# Altium PCB geared_motors.PcbDoc
Units mil, origin at the board's own origin, x right, y up, seen from the top; angles counter-clockwise.
Board outline 6000 x 4000 mil, 2 copper layers (Top Layer, Bottom Layer); 59 components, 40 nets, 210 pads, 0 vias.
Unrouted connection lines stored in the file: 130.
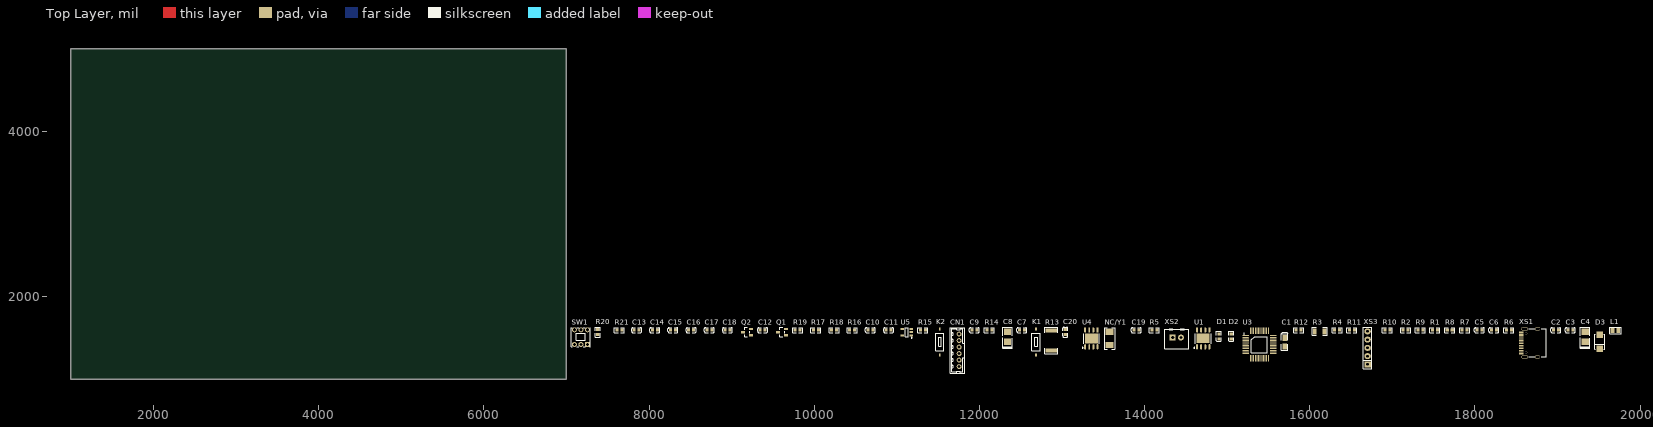
[diagram p0: Top Layer view]
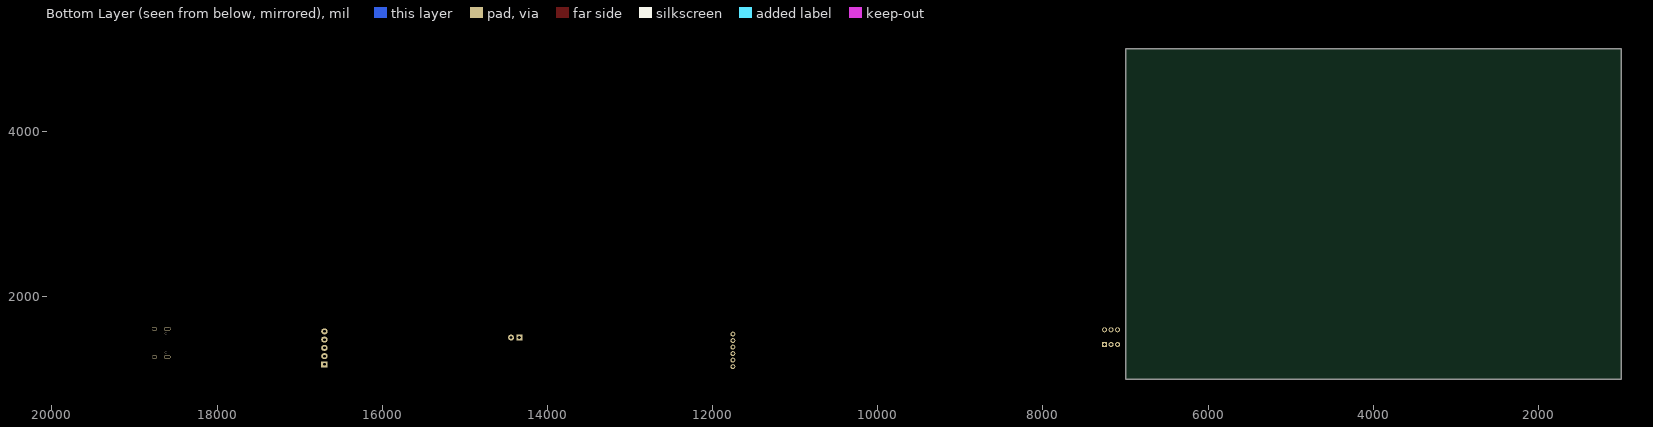
[diagram p1: Bottom Layer view, seen from below]

## Layer stack, top to bottom
Top Solder: solder mask 0.4, Solder Resist, Dk 3.5
Top Layer: signal copper 1.4
Dielectric 1: dielectric 12.6, FR-4, Dk 4.8
Bottom Layer: signal copper 1.4
Bottom Solder: solder mask 0.4, Solder Resist, Dk 3.5

## Board outline
1000,1000 7000,1000 7000,5000 1000,5000

## Design rules (kind name [scope] priority, off if disabled: settings)
AssemblyTestPointUsage [All] p0: scope1count=1 scope1_0_kind=Board scope1_0_value=Board scope2count=1 scope2_0_kind=Board scope2_0_value=Board commentlength=0
AssemblyTestpoint [All] p0: scope1count=1 scope1_0_kind=Board scope1_0_value=Board scope2count=1 scope2_0_kind=Board scope2_0_value=Board commentlength=0
Clearance [All] p0: scope1count=1 scope1_0_kind=Board scope1_0_value=Board scope2count=1 scope2_0_kind=Board scope2_0_value=Board commentlength=0 gap=10
Clearance [All] p1: gap=10 ignorepadtopadclearanceinfootprint=FALSE except(0: Arc-Hole Track-Hole SMDPad-Hole THPad-Hole Via-Hole Fill-Hole Poly-Hole Region-Hole Text-Hole)
ComponentClearance [All] p0: scope1count=1 scope1_0_kind=Board scope1_0_value=Board scope2count=1 scope2_0_kind=Board scope2_0_value=Board commentlength=0 gap=10 collisioncheckmode=3
DiffPairsRouting [All] p0: scope1count=1 scope1_0_kind=Board scope1_0_value=Board scope2count=1 scope2_0_kind=Board scope2_0_value=Board commentlength=0
FabricationTestPointUsage [All] p0: scope1count=1 scope1_0_kind=Board scope1_0_value=Board scope2count=1 scope2_0_kind=Board scope2_0_value=Board commentlength=0 valid=0 allowmultiple=FALSE
FabricationTestpoint [All] p0: scope1count=1 scope1_0_kind=Board scope1_0_value=Board scope2count=1 scope2_0_kind=Board scope2_0_value=Board commentlength=0 side=3 testpointundercomponent=TRUE minsize=40 maxsize=100 preferedsize=60 minholesize=0 maxholesize=40 preferedholesize=32 testpointgrid=1
FanoutControl Fanout_BGA [All] p0 off: scope1count=1 scope1_0_kind=Board scope1_0_value=Board scope2count=1 scope2_0_kind=Board scope2_0_value=Board commentlength=69 // Protel DXP Scope 1 Expression Was: IsBGA   Fanout_BGA (Default Rule)
FanoutControl Fanout_LCC [All] p0 off: scope1count=1 scope1_0_kind=Board scope1_0_value=Board scope2count=1 scope2_0_kind=Board scope2_0_value=Board commentlength=69 // Protel DXP Scope 1 Expression Was: IsLCC   Fanout_LCC (Default Rule)
FanoutControl Fanout_SOIC [All] p0 off: scope1count=1 scope1_0_kind=Board scope1_0_value=Board scope2count=1 scope2_0_kind=Board scope2_0_value=Board commentlength=71 // Protel DXP Scope 1 Expression Was: IsSOIC   Fanout_SOIC (Default Rule)
FanoutControl Fanout_Small [All] p0 off: scope1count=1 scope1_0_kind=Board scope1_0_value=Board scope2count=1 scope2_0_kind=Board scope2_0_value=Board commentlength=84 // Protel DXP Scope 1 Expression Was: (CompPinCount < 5)   Fanout_Small (Default Rule)
FanoutControl Fanout_Default [All] p0: scope1count=1 scope1_0_kind=Board scope1_0_value=Board scope2count=1 scope2_0_kind=Board scope2_0_value=Board commentlength=30 // Fanout_Default (Default Rule)
Height [All] p0: scope1count=1 scope1_0_kind=Board scope1_0_value=Board scope2count=1 scope2_0_kind=Board scope2_0_value=Board commentlength=0
HoleSize [All] p0: scope1count=1 scope1_0_kind=Board scope1_0_value=Board scope2count=1 scope2_0_kind=Board scope2_0_value=Board commentlength=0 absolutevalues=TRUE maxlimit=100 minlimit=1 maxpercent=80.000 minpercent=20.000
HoleToHoleClearance [All] p0: scope1count=1 scope1_0_kind=Board scope1_0_value=Board scope2count=1 scope2_0_kind=Board scope2_0_value=Board commentlength=0
LayerPairs [All] p0: scope1count=1 scope1_0_kind=Board scope1_0_value=Board scope2count=1 scope2_0_kind=Board scope2_0_value=Board commentlength=0 enforce=TRUE
MinimumSolderMaskSliver [All] p0: scope1count=1 scope1_0_kind=Board scope1_0_value=Board scope2count=1 scope2_0_kind=Board scope2_0_value=Board commentlength=0
NetAntennae [All] p0: scope1count=1 scope1_0_kind=Board scope1_0_value=Board scope2count=1 scope2_0_kind=Board scope2_0_value=Board commentlength=0
PasteMaskExpansion [All] p0: scope1count=1 scope1_0_kind=Board scope1_0_value=Board scope2count=1 scope2_0_kind=Board scope2_0_value=Board commentlength=0 expansion=0
PlaneClearance [All] p0: scope1count=1 scope1_0_kind=Board scope1_0_value=Board scope2count=1 scope2_0_kind=Board scope2_0_value=Board commentlength=0 clearance=20
PlaneConnect [All] p0: scope1count=1 scope1_0_kind=Board scope1_0_value=Board scope2count=1 scope2_0_kind=Board scope2_0_value=Board commentlength=0 planeconnectstyle=Relief reliefexpansion=20 reliefentries=4 reliefconductorwidth=10 reliefairgap=10
PolygonConnect [All] p0: scope1count=1 scope1_0_kind=Board scope1_0_value=Board scope2count=1 scope2_0_kind=Board scope2_0_value=Board commentlength=0 connectstyle=Relief reliefconductorwidth=10 reliefentries=4 polygonreliefangle="90 Angle"
PolygonConnect [All] p1: connectstyle=Relief reliefconductorwidth=10 reliefentries=4 polygonreliefangle="90 Angle" airgapwidth=10
RoutingCorners [All] p0: scope1count=1 scope1_0_kind=Board scope1_0_value=Board scope2count=1 scope2_0_kind=Board scope2_0_value=Board commentlength=0 cornerstyle=45-Degree minsetback=100 maxsetback=100
RoutingLayers [All] p0: scope1count=1 scope1_0_kind=Board scope1_0_value=Board scope2count=1 scope2_0_kind=Board scope2_0_value=Board commentlength=0 top layer=Automatic bottom layer=Automatic
RoutingPriority [All] p0: scope1count=1 scope1_0_kind=Board scope1_0_value=Board scope2count=1 scope2_0_kind=Board scope2_0_value=Board commentlength=0
RoutingTopology [All] p0: scope1count=1 scope1_0_kind=Board scope1_0_value=Board scope2count=1 scope2_0_kind=Board scope2_0_value=Board commentlength=0 topology=Shortest
RoutingVias [All] p0: scope1count=1 scope1_0_kind=Board scope1_0_value=Board scope2count=1 scope2_0_kind=Board scope2_0_value=Board commentlength=0 holewidth=28 width=50 viastyle="Through Hole" minholewidth=28 minwidth=50 maxholewidth=28 maxwidth=50
RoutingVias [All] p1: holewidth=28 width=50 viastyle="Through Hole" minholewidth=28 minwidth=50 maxholewidth=28 maxwidth=50
ShortCircuit [All] p0: scope1count=1 scope1_0_kind=Board scope1_0_value=Board scope2count=1 scope2_0_kind=Board scope2_0_value=Board commentlength=0 allowed=FALSE
SilkToBoardRegionClearance [All] p0: scope1count=1 scope1_0_kind=Board scope1_0_value=Board scope2count=1 scope2_0_kind=Board scope2_0_value=Board commentlength=0
SilkToSilkClearance [All] p0: scope1count=1 scope1_0_kind=Board scope1_0_value=Board scope2count=1 scope2_0_kind=Board scope2_0_value=Board commentlength=0
SilkToSolderMaskClearance [All] p0 off: scope1count=1 scope1_0_kind=Board scope1_0_value=Board scope2count=1 scope2_0_kind=Board scope2_0_value=Board commentlength=44 // Protel DXP Scope 1 Expression Was: IsPad
SolderMaskExpansion [All] p0: scope1count=1 scope1_0_kind=Board scope1_0_value=Board scope2count=1 scope2_0_kind=Board scope2_0_value=Board commentlength=0 expansion=4
SolderMaskExpansion [All] p1: expansion=4 istentingtop=FALSE
UnRoutedNet [All] p0: scope1count=1 scope1_0_kind=Board scope1_0_value=Board scope2count=1 scope2_0_kind=Board scope2_0_value=Board commentlength=0
UnpouredPolygon [All] p0: scope1count=1 scope1_0_kind=Board scope1_0_value=Board scope2count=1 scope2_0_kind=Board scope2_0_value=Board commentlength=0
Width [All] p0: scope1count=1 scope1_0_kind=Board scope1_0_value=Board scope2count=1 scope2_0_kind=Board scope2_0_value=Board commentlength=0 maxlimit=10 minlimit=10 preferedwidth=10
Width [All] p1: maxlimit=10 minlimit=10 preferedwidth=10
30 further rules are at their usual default settings.

## Components (designator, comment, footprint, x,y, rotation, side; value= is the part's Value field where it differs from the comment)
C1 "10uF (106) ±10% 16V" CASE-A_3216 15695,1450 r90 top
C2 "22uF (226) 20% 6.3V" 0603_C 18980,1595 r0 top
C3 "22uF (226) 20% 6.3V" 0603_C 19155,1595 r0 top
C4 "10uF-16V" CAP-B(3528) 19335,1515 r90 top
C5 "22uF (226) 20% 6.3V" 0603_C 18055,1595 r0 top
C6 "22uF (226) 20% 6.3V" 0603_C 18230,1595 r0 top
C7 "100nF (104) 10% 50V" 0603_C 12515,1595 r0 top
C8 "10uF-16V" CAP-B(3528) 12340,1515 r90 top
C9 "100nF (104) 10% 50V" 0603_C 11940,1595 r0 top
C10 "100nF (104) 10% 50V" 0603_C 10680,1595 r0 top
C11 "10uF (106) 10% 10V" 0603_C 10900,1595 r0 top
C12 "22nF (223) 10% 50V" 0603_C 9375,1595 r0 top
C13 "100nF (104) 10% 50V" 0603_C 7850,1595 r0 top
C14 "100nF (104) 10% 50V" 0603_C 8070,1595 r0 top
C15 "100nF (104) 10% 50V" 0603_C 8290,1595 r0 top
C16 "100nF (104) 10% 50V" 0603_C 8510,1595 r0 top
C17 "100nF (104) 10% 50V" 0603_C 8730,1595 r0 top
C18 "100nF (104) 10% 50V" 0603_C 8950,1595 r0 top
C19 "30pF (300) 5% 50V" 0603_C 13900,1595 r0 top
C20 "30pF (300) 5% 50V" 0603_C 13040,1570 r90 top
CN1 "b6b-ph-k-s(lf)(sn)" CONN-TH_B6B-PH-K-S 11755,1350 r90 top
D1 "绿灯 0603" 0603_LED_S1 14900,1520 r90 top
D2 "红灯 0603" 0603_LED_S1 15050,1520 r90 top
D3 "SS54" SMA(DO-214AC)_S1 19510,1455 r90 top
K1 "KEY" KEY2 12685,1295 r90 top
K2 "KEY" KEY2 11520,1295 r90 top
L1 "3.3uH±10%" 0805_L 19700,1590 r0 top
NC/Y1 "8MHz ±20ppm 20pF" SMD-5032_2P 13575,1495 r90 top
Q1 "SS8550 Y2" SOT-23(SOT-23-3) 9610,1570 r0 top
Q2 "SS8050 Y1" SOT-23(SOT-23-3) 9185,1570 r0 top
R1 "10KΩ (1002) ±1%" 0603_R 17515,1595 r0 top
R2 "10KΩ (1002) ±1%" 0603_R 17160,1595 r0 top
R3 "0.1Ω (R100) ±1%" 1206_R 16120,1580 r0 top
R4 "1KΩ (1001) ±1%" 0603_R 16330,1595 r0 top
R5 "1.2KΩ (1201) ±1%" 0603_R 14120,1595 r0 top
R6 "100KΩ (1003) ±1%" 0603_R 18410,1595 r0 top
R7 "22Ω (22R0) ±1%" 0603_R 17875,1595 r0 top
R8 "22Ω (22R0) ±1%" 0603_R 17695,1595 r0 top
R9 "47KΩ (4702) ±1%" 0603_R 17340,1595 r0 top
R10 "5.1KΩ (5101) ±1%" 0603_R 16940,1595 r0 top
R11 "10KΩ (1002) ±1%" 0603_R 16510,1595 r0 top
R12 "10KΩ (1002) ±1%" 0603_R 15865,1595 r0 top
R13 "R 0.25" 2512_R 12870,1470 r90 top
R14 "10KΩ (1002) ±1%" 0603_R 12120,1595 r0 top
R15 "10KΩ (1002) ±1%" 0603_R 11315,1595 r0 top
R16 "10KΩ (1002) ±1%" 0603_R 10460,1595 r0 top
R17 "510Ω (5100) ±1%" 0603_R 10020,1595 r0 top
R18 "10KΩ (1002) ±1%" 0603_R 10240,1595 r0 top
R19 "1KΩ (1001) ±1%" 0603_R 9800,1595 r0 top
R20 "10KΩ (1002) ±1%" 0603_R 7380,1570 r90 top
R21 "10KΩ (1002) ±1%" 0603_R 7640,1595 r0 top
SW1 "5.8 ZSGT" SW-TH_5.8ZSGT 7175,1510 r0 top
U1 "TP4056" SOP-8_EP_150mil 14710,1495 r0 top
U3 "STM32F103C8T6" LQFP-48 15390,1420 r0 top
U4 "A4950" SOIC-8_EP_150mil 13355,1495 r0 top
U5 "RT9193-33" SOT-23-5 11120,1570 r0 top
XS1 "TYPE-C" Type-C-TOP 18660,1440 r0 top
XS2 "HA-2A" HA-2A 14390,1505 r0 top
XS3 "SIP-5" SIP-5 16700,1380 r90 top

## Footprints (in the part's own frame and the unit in brackets; to place one, negate y for a bottom-side part, rotate by r counter-clockwise, add the part's x,y. Pads: shape width x height; smd on the part's side, far side on the other; paste and mask are expansions set on the pad)
0603_C [mm]
  rect 0.93x0.98 smd: 1(-0.77,0) 2(0.77,0)
  silkscreen extent -1.53,-0.79 1.54,0.79
0603_LED_S1 [mm]
  rect 0.93x0.98 smd: A(0.77,0) K(-0.77,0)
  silkscreen extent -1.5,-0.79 1.54,0.79
0603_R [mm]
  rect 0.93x0.98 smd: 1(-0.77,0) 2(0.77,0)
  silkscreen extent -1.53,-0.79 1.54,0.79
0805_L [mm]
  rect 1.16x1.47 smd: 1(-0.89,0) 2(0.89,0)
  silkscreen extent -1.77,-1.04 1.77,1.03
1206_R [mm]
  rect 1.13x1.8 smd: 1(-1.49,0) 2(1.49,0)
  silkscreen extent -2.36,-1.2 2.35,1.2
2512_R [mm]
  rect 1.25x3.42 smd: 1(-3.1,0) 2(3.1,0)
  silkscreen extent -4.03,-2.01 4.02,2.01
CAP-B(3528) [mm] "B型钽电容"
  rect 2x2.2 smd: 1(-1.5,0) 2(1.5,0)
  silkscreen extent -3.58,-1.47 2.9,1.47
CASE-A_3216 [mm]
  rect 1.8x1.35 smd: 1(1.31,0) 2(-1.31,0)
  silkscreen extent -2.54,-1 2.97,1
CONN-TH_B6B-PH-K-S [mm]
  round 1.5 hole 0.9 paste+0 mask+0: 1(5,0) 2(3,0) 3(1,0) 4(-1,0) 5(-3,0) 6(-5,0)
  silkscreen extent -7,-1.7 7,2.8
HA-2A [mm]
  rect 1.8x1.8 hole 1: 1(-1.27,0)
  round 1.8 hole 1: 2(1.27,0)
  silkscreen extent -3.77,-3.5 3.73,2.5
KEY2 [mm]
  rect 1x0.6 smd: 1(0,0) 2(8,0)
  silkscreen extent 1.33,-1.25 6.67,1.25
LQFP-48 [mm]
  rect 2x0.305 smd: 1(-4.25,2.75)
  oval 2x0.305 smd: 2(-4.25,2.25) 3(-4.25,1.75) 4(-4.25,1.25) 5(-4.25,0.75) 6(-4.25,0.25) 7(-4.25,-0.25) 8(-4.25,-0.75) 9(-4.25,-1.25) 10(-4.25,-1.75) 11(-4.25,-2.25) 12(-4.25,-2.75) 25(4.25,-2.75) 26(4.25,-2.25) 27(4.25,-1.75) 28(4.25,-1.25) 29(4.25,-0.75) 30(4.25,-0.25) 31(4.25,0.25) 32(4.25,0.75) 33(4.25,1.25) 34(4.25,1.75) 35(4.25,2.25) 36(4.25,2.75)
  oval 0.305x2 smd: 13(-2.75,-4.25) 14(-2.25,-4.25) 15(-1.75,-4.25) 16(-1.25,-4.25) 17(-0.75,-4.25) 18(-0.25,-4.25) 19(0.25,-4.25) 20(0.75,-4.25) 21(1.25,-4.25) 22(1.75,-4.25) 23(2.25,-4.25) 24(2.75,-4.25) 37(2.75,4.25) 38(2.25,4.25) 39(1.75,4.25) 40(1.25,4.25) 41(0.75,4.25) 42(0.25,4.25) 43(-0.25,4.25) 44(-0.75,4.25) 45(-1.25,4.25) 46(-1.75,4.25) 47(-2.25,4.25) 48(-2.75,4.25)
  silkscreen extent -4.85,-2.45 2.45,3.51
SIP-5 [mm]
  rect 1.8x2 hole 0.813: 1(-5.08,0)
  oval 1.8x2 hole 0.813: 2(-2.54,0) 3(0,0) 4(2.54,0) 5(5.08,0)
  silkscreen extent -6.35,-1.27 6.35,1.27
SMA(DO-214AC)_S1 [mm]
  rect 2x2 smd: 1(2.1,0) 2(-2.1,0)
  silkscreen extent -2.35,-1.5 2.35,1.5
SMD-5032_2P [mm]
  rect 1.9x2.4 smd: 1(-2.05,0) 2(2.05,0)
  silkscreen extent -3.32,-1.6 3.32,1.6
SOIC-8_EP_150mil [mm]
  rect 4x3 smd: 0(0,0)
  oval 0.6x1.6 smd: 1(-1.905,-2.6) 2(-0.635,-2.6) 3(0.635,-2.6) 4(1.905,-2.6) 5(1.905,2.6) 6(0.635,2.6) 7(-0.635,2.6) 8(-1.905,2.6)
  silkscreen extent -2.85,-3.05 2.4,1.5
SOP-8_EP_150mil [mm]
  rect 4x2.9 smd: 0(0,0)
  oval 0.6x1.6 smd: 1(-1.905,-2.6) 2(-0.635,-2.6) 3(0.635,-2.6) 4(1.905,-2.6) 5(1.905,2.6) 6(0.635,2.6) 7(-0.635,2.6) 8(-1.905,2.6)
  silkscreen extent -2.85,-3.05 2.4,1.5
SOT-23(SOT-23-3) [mm]
  rect 1.25x0.7 smd: 1(1.25,-0.95) 2(1.25,0.95) 3(-1.25,0)
  silkscreen extent -0.65,-1.46 0.9,1.46
SOT-23-5 [mm]
  rect 1.1x0.6 smd: 1(1.4,-0.95) 2(1.4,0) 3(1.4,0.95) 4(-1.4,0.95) 5(-1.4,-0.95)
  silkscreen extent -0.5,-1.87 1.63,1.4
SW-TH_5.8ZSGT [mil]
  rect 60x60 hole 39.37: 1(78.74,-88.59)
  round 60 hole 39.37: 2(0,-88.59) 3(-78.74,-88.59) 4(78.74,88.59) 5(0,88.59) 6(-78.74,88.59)
  Mechanical 1 keep-out region: 7719.09,-85.47 7730.91,-85.47 7730.91,-38.23 7719.09,-38.23
  silkscreen extent -115,-115 115,115
Type-C-TOP [mm]
  round 0.65 hole 0.65: 0(-0.98,-2.89) 0(-0.98,2.89)
  oval 1.6x1 hole 0.6 slot 1.2 at 0 deg: 1(2.52,4.325) 2(2.52,-4.325)
  oval 2.1x1 hole 0.6 slot 1.7 at 0 deg: 3(-1.48,-4.325) 4(-1.48,4.325)
  rrect50% 1.5x0.6 smd: A1B12(-2.52,-3.2) A4B9(-2.52,-2.4) A9B4(-2.52,2.4) A12B1(-2.52,3.2)
  rrect50% 1.5x0.3 smd: A5(-2.52,-1.25) A6(-2.52,-0.25) A7(-2.52,0.25) A8(-2.52,1.25) B5(-2.52,1.75) B6(-2.52,0.75) B7(-2.52,-0.75) B8(-2.52,-1.75)
  silkscreen extent -0.22,-4.33 5.12,4.33

## Part data
C1: library part "3216 10uF (106) 10% 16V", "钽电容"
C2 C3 C5 C6: library part "0603 22uF (226) 20% 6.3V", "贴片电容"
C4 C8: library part C-10uF-16V-B型钽电解电容, "10uF-16V-K-B型"
C7 C9 C10 C13 C14 C15 C16 C17 C18: library part "0603 100nF (104) 10% 50V", "贴片电容"
C11: library part "0603 10uF (106) 10% 10V", "贴片电容"
C12: library part "0603 22nF (223) 10% 50V", "贴片电容"
C19 C20: library part "0603 30pF (300) 5% 50V", "贴片电容"
CN1: library part "PH2.0 1*6p", "插针结构:1x6P;间距:2mm;安装方式:直插;参考系列:PH;总PIN数:6P;排数:1;每排PIN数:6;行距:-;额定电流:2A;触头材质:黄铜;触头镀层:锡;工作温度:-25℃~+85℃;"
D1: library part "0603 绿灯", "发光二极管"
D2: library part "0603 红灯", "发光二极管"
D3: library part "SMA(DO-214AC) SS54", "二极管"
K1 K2: library part KEY_PIN2, "微动 贴片2脚"
L1: library part "0805 3.3uH10%", "贴片电感"
NC/Y1: library part "SMD-5032_2P 8MHz 20ppm 20pF", "贴片晶振"
Q1: library part "SOT-23 SS8550 Y2", "三极管"
Q2: library part "SOT-23 SS8050 Y1", "三极管"
R1 R2 R11 R12 R14 R15 R16 R18 R20 R21: library part "0603 10KΩ (1002) 1%", "贴片电阻"
R3: library part "1206 0.1Ω (R100) 1%", "贴片电阻"
R4 R19: library part "0603 1KΩ (1001) 1%", "贴片电阻"
R5: library part "0603 1.2KΩ (1201) 1%", "贴片电阻"
R6: library part "0603 100KΩ (1003) 1%", "贴片电阻"
R7 R8: library part "0603 22Ω (22R0) 1%", "贴片电阻"
R9: library part "0603 47KΩ (4702) 1%", "贴片电阻"
R10: library part "0603 5.1KΩ (5101) 1%", "贴片电阻"
R13: library part R_2512
R17: library part "0603 510Ω (5100) 1%", "贴片电阻"
SW1: library part 自锁按键开关, "30V 双刀双掷 直插 自锁 泡泡机开关"
U1: library part TP4056_[C16581], "电池电源管理"
U3: "STM32F103C8T6-LQFP-48"
U5: "3.3V超低压差LDO"
XS1: "PIN16"
XS2: "HA-2A 白色"
XS3: "单列直插插座-5"

## Nets (pads, with @x,y where several pads share a name; then routed paths per layer and width w, separated by ;. In a path a pad name is that pad's centre, name@x,y a point inside that pad or via, vN(x,y) a via of type N, cw(c..) or ccw(c..) an arc to the next point about the centre after c; other vN are vias at no path point)
3.3V: C11.2 C13.2 C14.2 C15.2 C16.2 C17.2 C18.2 CN1.5 K2.2 R11.2 R12.2 R14.1 U3.1 U3.9 U3.24 U3.36 U3.48 U4.4 U5.5 XS3.1
12V: C2.2 C3.2 C4.1 C7.2 C8.1 D3.2 R6.2 U4.5
12V_EN: Q1.3 R21.2
AO: U3.27 U4.2
Battey: C5.2 C6.2 L1.1 Q1.2 R18.2 U1.5 XS2.1
BO: U3.26 U4.3
BOOT0: K2.1 R15.2 U3.44
BOOT1: R16.2 U3.20
DM: R7.2 U3.32
DP: R8.2 U3.33
EN12V: R17.2 U3.28
GND: C1.2 C2.1 C3.1 C4.2 C5.1 C6.1 C7.1 C8.2 C9.2 C10.1 C11.1 C12.2 C13.1 C14.1 C15.1 C16.1 C17.1 C18.1 C19.1 C20.1 CN1.2 K1.2 Q2.2 R1.2 R2.1 R5.1 R9.1 R10.1 R13.2 R15.1 R16.1 R20.2 R21.1 U1.1 U1.3 U3.8 U3.23 U3.35 U3.47 U4.0 U4.1 U5.2 XS1.A1B12 XS1.A12B1 XS2.2 XS3.5
M1O1: CN1.1 U4.8
M1O2: CN1.6 U4.6
NetC1_1: C1.1 R3.2 R4.1 U1.4 U1.8
NetC12_1: C12.1 U5.4
NetD1_A: D1.A D2.A R4.2
NetD1_K: D1.K U1.6
NetD2_K: D2.K U1.7
NetD3_1: D3.1 L1.2
NetQ1_1: Q1.1 R19.2
NetQ2_1: Q2.1 R17.1 R20.1
NetQ2_3: Q2.3 R18.1 R19.1
NetR1_1: R1.1 XS1.A5
NetR2_2: R2.2 XS1.B5
NetR5_2: R5.2 U1.2
NetR6_1: R6.1 R10.2
NetR9_2: R9.2
NetR13_1: R13.1 U4.7
OSC_1: C19.2 NC/Y1.2 U3.5
OSC_2: C20.2 NC/Y1.1 U3.6
RES: C9.1 K1.1 R14.2 U3.7 XS3.4
SW: C10.2 U5.1 U5.3
TCK: R12.1 U3.37 XS3.3
TIM2_CH1: CN1.3 U3.10
TIM2_CH2: CN1.4 U3.11
TMS: R11.1 U3.34 XS3.2
USB-PWR-DM: R7.1 XS1.A7 XS1.B7
USB-PWR-DP: R8.1 XS1.A6 XS1.B6
VBUS: R3.1 XS1.A4B9 XS1.A9B4
pads on no net: SW1.1 SW1.2 SW1.3 SW1.4 SW1.5 SW1.6 U1.0 U3.2 U3.3 U3.4 U3.12 U3.13 U3.14 U3.15 U3.16 U3.17 U3.18 U3.19 U3.21 U3.22 U3.25 U3.29 U3.30 U3.31 U3.38 U3.39 U3.40 U3.41 U3.42 U3.43 U3.45 U3.46 XS1.0 XS1.1 XS1.2 XS1.3 XS1.4 XS1.A8 XS1.B8